# Altium PCB CubliV2PCB.PcbDoc (part 2 of 2)
Units mm, origin at the board's own origin, x right, y up, seen from the top; angles counter-clockwise.
Board outline 85.09 x 80.51 mm, 2 copper layers (Top Layer, Bottom Layer); 107 components, 65 nets, 363 pads, 141 vias.
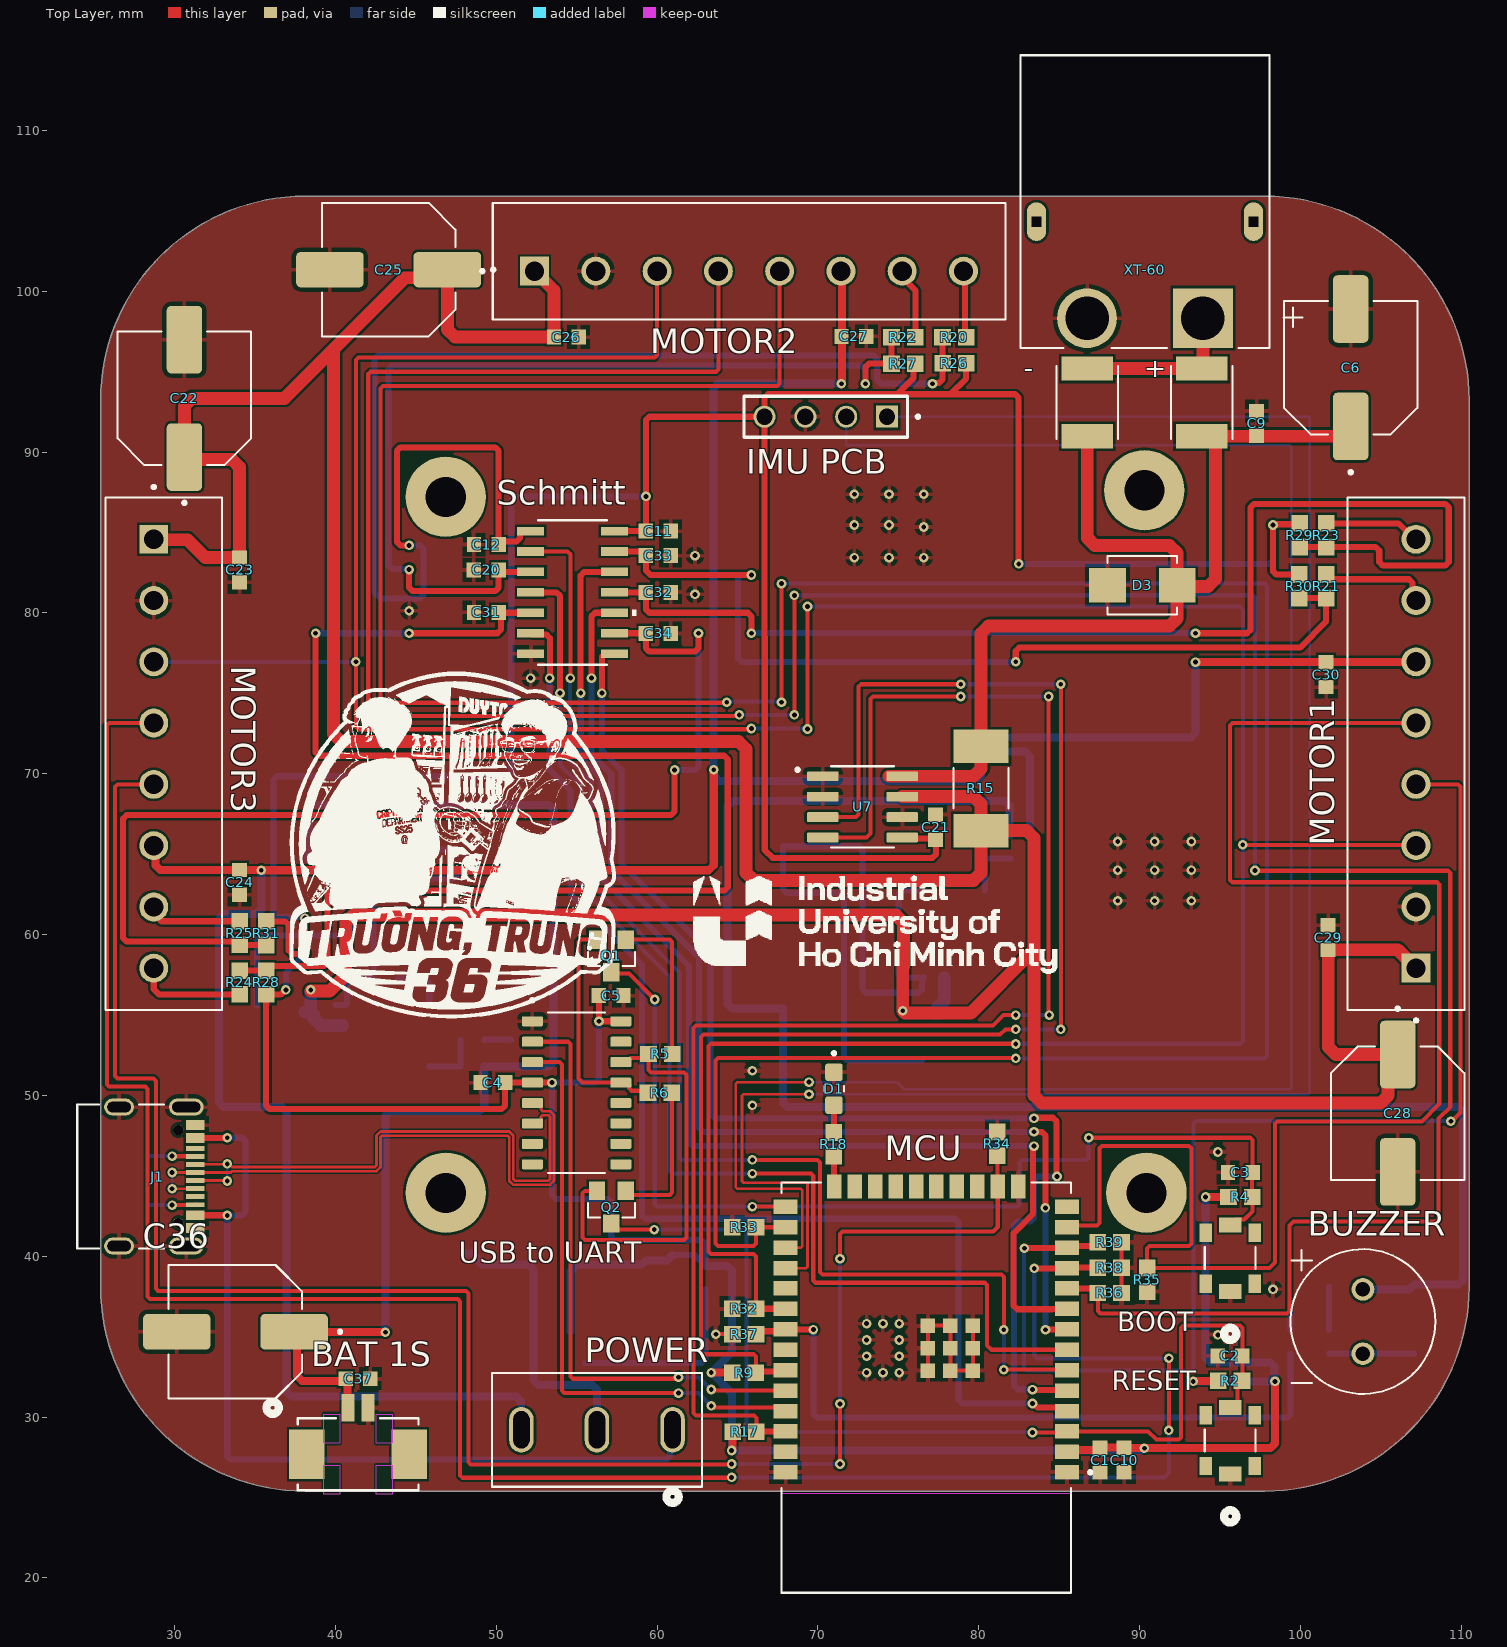
[diagram p0: Top Layer view]

## Via types
v1: diameter 0.6, hole 0.3, Top Layer to Bottom Layer, tented both sides, 141 vias

## Nets (pads, with @x,y where several pads share a name; then routed paths per layer and width w, separated by ;. In a path a pad name is that pad's centre, name@x,y a point inside that pad or via, vN(x,y) a via of type N, cw(c..) or ccw(c..) an arc to the next point about the centre after c; other vN are vias at no path point) (continued)
SDA: (continued)
  Top Layer w0.254: R9.1 66.14,33.76 65.991,33.909 62.887,33.909 62.738,34.058 62.738,53.63 62.887,53.779 81.329,53.779 81.657,54.107 v1(82.295,54.107) ; U7.3 72.368,67.31 72.517,67.459 72.517,75.416 72.666,75.565 v1@78.867,75.565 ; v1@85.09,54.102 85.102,54.114 v1(85.102,75.57)
  Top Layer w0.38: R9.1 66.216,32.842 67.91,32.842 MCU.33
  Bottom Layer w0.254: v1(78.879,75.57) 85.085,75.57 v1@85.09,75.565 ; v1(82.295,54.107) v1(85.102,54.107)
SENS_RX: "IMU PCB.02" MCU.27 | length 119.3
  Top Layer w0.16: MCU.27 68.935,40.537 69.029,40.631 69.029,44.102 68.935,44.196 64.991,44.196 64.897,44.29 64.897,50.733 64.991,50.827 v1(69.441,50.827)
  Bottom Layer w0.16: v1(69.441,50.827) 74.904,50.827 75.344,50.387 99.347,50.387 99.441,50.481 99.441,90.33 99.347,90.424 71.849,90.424 71.755,90.518 71.755,92.202
SENS_TX: "IMU PCB.01" MCU.28 | length 119.6
  Top Layer w0.16: MCU.28 69.255,39.267 69.348,39.361 69.348,44.483 69.255,44.577 65.372,44.577 65.278,44.671 65.278,49.981 65.372,50.074 v1(69.443,50.074)
  Bottom Layer w0.16: v1(69.443,50.074) 100.49,50.074 100.584,50.168 100.584,92.108 100.49,92.202 74.295,92.202
STATUS: MCU.24 R18.1 | length 1.9
  Top Layer w0.38: R18.1 71.007,46.214 71.007,44.341 MCU.24
USB+: J1.A4_B9 J1.B4_A9 POWER.1 | length 55.2
  Top Layer w0.38: J1.B4_A9 31.294,42.551 33.268,42.551 v1(33.274,42.545) ; J1.A4_B9 31.294,47.365 33.268,47.365 v1(33.274,47.371)
  Bottom Layer w0.38: v1(33.274,47.371) 34.194,47.371 34.417,47.148 34.417,42.768 34.194,42.545 v1(33.274,42.545) 33.274,27.592 33.497,27.369 60.585,27.369 60.808,27.592 60.808,29.057 POWER.1
USB_N: "USB to UART.6" J1.A7 J1.B7 | length 35.4
  Top Layer w0.17: J1.A7 31.29,44.706 33.245,44.706 v1(33.274,44.677) ; J1.B7 31.294,45.714 33.421,45.714 33.589,45.546 42.445,45.546 42.545,45.646 42.545,47.503 42.793,47.751 50.805,47.751 51.053,47.503 51.053,44.803 51.153,44.703 53.241,44.703 53.341,44.803 53.341,48.669 53.241,48.769 52.872,48.769 52.772,48.669 52.772,48.485 52.547,48.26 52.241,48.26
  Bottom Layer w0.17: v1(33.274,44.677) v1(33.274,45.747)
USB_P: "USB to UART.5" J1.A6 J1.B6 | length 37
  Top Layer w0.17: v1(29.845,44.196) 29.851,44.202 31.282,44.202 J1.B6 ; v1(29.845,45.212) 29.847,45.21 31.286,45.21 J1.A6 31.292,45.212 33.49,45.212 33.572,45.293 42.55,45.293 42.798,45.541 42.798,47.398 42.898,47.498 50.7,47.498 50.8,47.398 50.8,44.698 51.048,44.45 53.346,44.45 53.594,44.698 53.594,48.774 53.346,49.021 52.872,49.021 52.772,49.121 52.772,49.305 52.547,49.53 52.241,49.53
  Bottom Layer w0.17: v1(29.845,44.196) v1(29.845,45.212)
pads on no net: "BAT 1S.3" "BAT 1S.4" "USB to UART.7" "USB to UART.8" "USB to UART.9" "USB to UART.10" "USB to UART.11" "USB to UART.12" "USB to UART.15" BOOT.3 BOOT.4 BOOT.5 BOOT.6 J1. J1.A8 J1.B8 MCU.14 MCU.17 MCU.18 MCU.19 MCU.20 MCU.21 MCU.22 MCU.23 MCU.29 MCU.32 MCU.37 RESET.3 RESET.4 RESET.5 RESET.6 U3.2 U3.3 U3.5 U4.4 U6.2 U6.3 U6.5 XT-60.SH1 XT-60.SH2

## Polygon pours and split planes (outlines as drawn)
GND on Bottom Layer "BOTTOM_GND_POUR" (solid, remove dead copper, pour order 0): 25.4,93.218 25.4,38.1 ccw(c38.1,38.1) 38.1,25.4 97.79,25.4 ccw(c97.79,38.1) 110.49,38.1 110.49,93.218 ccw(c97.79,93.218) 97.79,105.918 38.1,105.918 ccw(c38.1,93.218)
GND on Top Layer "TOP_GND_POUR" (solid, remove dead copper, pour order 1): 25.39,93.201 25.39,38.083 ccw(c38.09,38.083) 38.09,25.383 97.78,25.383 ccw(c97.78,38.083) 110.48,38.083 110.48,93.201 ccw(c97.78,93.201) 97.78,105.901 38.09,105.901 ccw(c38.09,93.201)

## Silkscreen, mask and mechanical layers (free items; w line width, h text height)
Top Overlay:
  drawing of 451 lines, arcs and shapes, not listed

## Text inside footprints (layer, text, board x,y; h text height)
MCU: Mechanical 13 "ANTENNA" at 82.735,22.827 h1.78 r180